# Altium PCB PCB_Flex_26.PcbDoc
Units mil, origin at the board's own origin, x right, y up, seen from the top; angles counter-clockwise.
Board outline 2362.2 x 531.5 mil, 2 copper layers (Top Layer, Bottom Layer), stack 3.556 mil thick; 4 components, 24 nets, 104 pads, 24 vias.
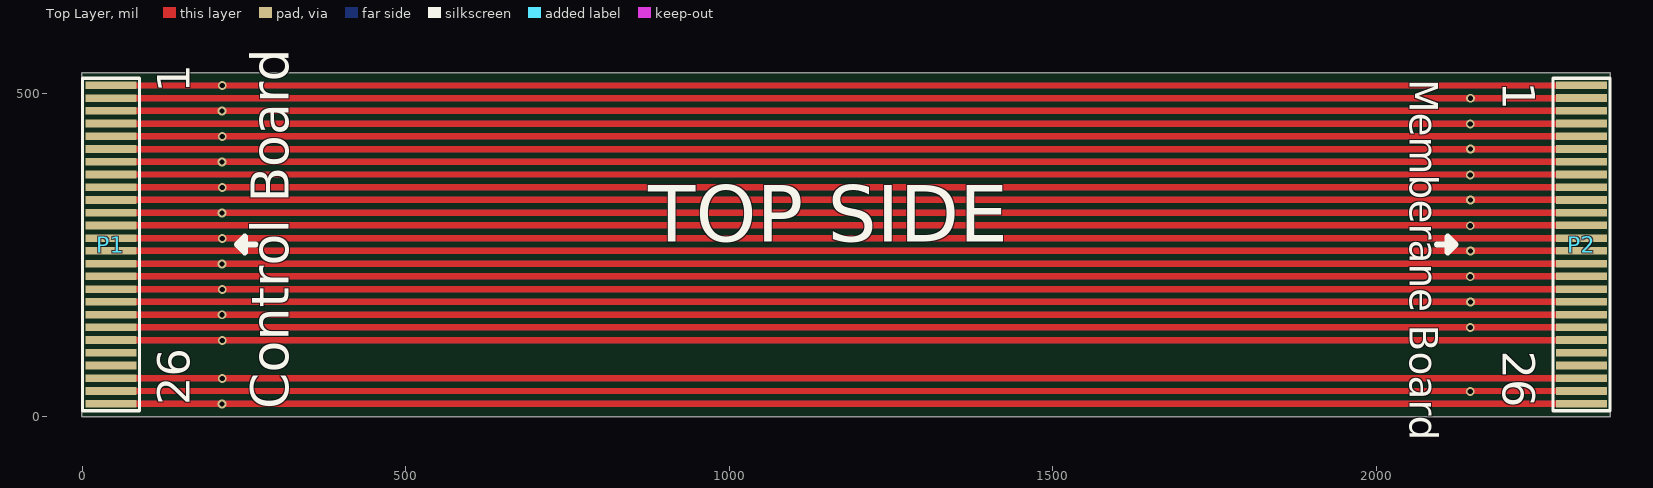
[diagram p0: Top Layer view]
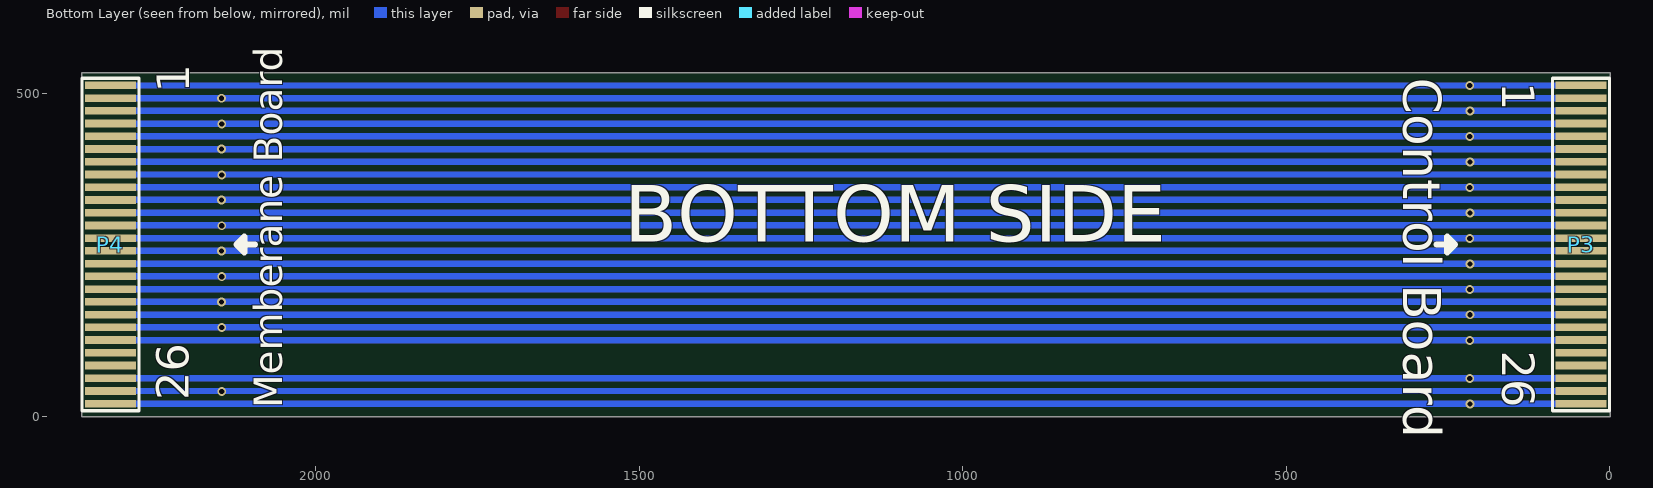
[diagram p1: Bottom Layer view, seen from below]

## Layer stack, top to bottom
Top Solder: solder mask 0.5, Solder Resist, Dk 3.5
Top Layer: signal copper 1.378
Dielectric 1: core 0.8, Polymide, Dk 4.8
Bottom Layer: signal copper 1.378
Bottom Solder: solder mask 0.5, Solder Resist, Dk 3.5

## Board outline
-1,0 2361.2,0 2361.2,531.5 -1,531.5

## Design rules (kind name [scope] priority, off if disabled: settings)
Clearance [All] p1: gap=5 ignorepadtopadclearanceinfootprint=FALSE
PolygonConnect [All] p1: connectstyle=Relief reliefconductorwidth=10 reliefentries=4 polygonreliefangle="90 Angle" airgapwidth=10
RoutingVias [All] p1: holewidth=11.81 width=23.62 viastyle="Through Hole" minholewidth=7.87 minwidth=13.78 maxholewidth=31.5 maxwidth=62.99
SolderMaskExpansion [All] p1: expansion=4 istentingtop=FALSE
Width [All] p1: maxlimit=10 minlimit=6 preferedwidth=8
30 further rules are at their usual default settings.

## Components (designator, comment, footprint, x,y, rotation, side; value= is the part's Value field where it differs from the comment)
P1 "26 Pin SMD PAD(2MM)" "26 PIN SMD PAD(2MM)" 44,265.91 r90 top locked
P2 "26 Pin SMD PAD(2MM)" "26 PIN SMD PAD(2MM)" 2317,265.92 r90 top locked
P3 "26 Pin SMD PAD(2MM)" "26 Pin SMD PAD(2mm)" 44,265.91 r90 bottom
P4 "26 Pin SMD PAD(2MM)" "26 Pin SMD PAD(2mm)" 2316.99,265.91 r90 bottom

## Footprints (in the part's own frame and the unit in brackets; to place one, negate y for a bottom-side part, rotate by r counter-clockwise, add the part's x,y. Pads: shape width x height; smd on the part's side, far side on the other; paste and mask are expansions set on the pad)
"26 PIN SMD PAD(2MM)" [mm]
  rect 0.3x2 smd: 1(6.25,0) 2(5.75,0) 3(5.25,0) 4(4.75,0) 5(4.25,0) 6(3.75,0) 7(3.25,0) 8(2.75,0) 9(2.25,0) 10(1.75,0) 11(1.25,0) 12(0.75,0) 13(0.25,0) 14(-0.25,0) 15(-0.75,0) 16(-1.25,0) 17(-1.75,0) 18(-2.25,0) 19(-2.75,0) 20(-3.25,0) 21(-3.75,0) 22(-4.25,0) 23(-4.75,0) 24(-5.25,0) 25(-5.75,0) 26(-6.25,0)
  silkscreen extent -6.53,-1.12 6.53,1.12
"26 Pin SMD PAD(2mm)" [mm]
  rect 0.3x2 smd: 1(6.25,0) 2(5.75,0) 3(5.25,0) 4(4.75,0) 5(4.25,0) 6(3.75,0) 7(3.25,0) 8(2.75,0) 9(2.25,0) 10(1.75,0) 11(1.25,0) 12(0.75,0) 13(0.25,0) 14(-0.25,0) 15(-0.75,0) 16(-1.25,0) 17(-1.75,0) 18(-2.25,0) 19(-2.75,0) 20(-3.25,0) 21(-3.75,0) 22(-4.25,0) 23(-4.75,0) 24(-5.25,0) 25(-5.75,0) 26(-6.25,0)
  silkscreen extent -6.53,-1.12 6.53,1.12

## Part data
P1 P2 P3 P4: "Ribbon Wire Connecting PADs, Length 1.6mm."

## Via types
v1: diameter 13.78, hole 7.87, Top Layer to Bottom Layer, tented both sides, 24 vias

## Nets (pads, with @x,y where several pads share a name; then routed paths per layer and width w, separated by ;. In a path a pad name is that pad's centre, name@x,y a point inside that pad or via, vN(x,y) a via of type N, cw(c..) or ccw(c..) an arc to the next point about the centre after c; other vN are vias at no path point)
COl_1: P1.1 P2.1 P3.1 P4.1 | length 4546.9
  Top Layer w10: P1.1 44.28,511.71 215.74,511.71 v1(216,511.45) 216.27,511.72 2316.73,511.72 P2.1
  Bottom Layer w10: P3.1 44.28,511.71 215.74,511.71 v1(216,511.45) 216.26,511.71 2316.73,511.71 P4.1
COl_2: P1.2 P2.2 P3.2 P4.2 | length 4546
  Top Layer w10: P1.2 P2.2@2316.99,492.29
  Bottom Layer w10: P3.2 P4.2
  other v1: 2145.28,492.04
COl_3: P1.3 P2.3 P3.3 P4.3 | length 4546
  Top Layer w10: P1.3@44.01,472.61 P2.3
  Bottom Layer w10: P3.3 P4.3@2316.98,472.6
  other v1: 215.73,472.35
COl_4: P1.4 P2.4 P3.4 P4.4 | length 4546
  Top Layer w10: P1.4 P2.4
  Bottom Layer w10: P3.4 P4.4
  other v1: 2145,452.41
COl_5: P1.5 P2.5 P3.5 P4.5 | length 4546
  Top Layer w10: P1.5 P2.5
  Bottom Layer w10: P3.5 P4.5
  other v1: 216.01,432.72
COl_6: P1.6 P2.6 P3.6 P4.6 | length 4546
  Top Layer w10: P1.6 P2.6
  Bottom Layer w10: P3.6 P4.6
  other v1: 2145.27,413.31
COl_7: P1.7 P2.7 P3.7 P4.7 | length 4546
  Top Layer w10: P1.7 P2.7
  Bottom Layer w10: P3.7 P4.7
  other v1: 215.74,393.61
COl_8: P1.8 P2.8 P3.8 P4.8 | length 4546
  Top Layer w10: P1.8 P2.8
  Bottom Layer w10: P3.8 P4.8
  other v1: 2144.98,373.65
COl_9: P1.9 P2.9 P3.9 P4.9 | length 4546
  Top Layer w10: P1.9 P2.9@2316.98,354.49
  Bottom Layer w10: P3.9 P4.9
  other v1: 216,353.97
COl_10: P1.10 P2.10 P3.10 P4.10 | length 4546
  Top Layer w10: P1.10 P2.10
  Bottom Layer w10: P3.10@43.99,334.8 P4.10@2316.98,334.8
  other v1: 2145.25,334.55
COl_11: P1.11 P2.11 P3.11 P4.11 | length 4546
  Top Layer w10: P1.11 P2.11
  Bottom Layer w10: P3.11 P4.11
  other v1: 215.73,314.87
COl_12: P1.12 P2.12 P3.12 P4.12 | length 4546
  Top Layer w10: P1.12 P2.12
  Bottom Layer w10: P3.12 P4.12
  other v1: 2145,294.93
COl_13: P1.13 P2.13 P3.13 P4.13 | length 4546
  Top Layer w10: P1.13 P2.13
  Bottom Layer w10: P3.13 P4.13
  other v1: 216,275.23
COl_14: P1.14 P2.14 P3.14 P4.14 | length 4546
  Top Layer w10: P1.14 P2.14
  Bottom Layer w10: P3.14 P4.14
  other v1: 2145.27,255.83
COl_15: P1.15 P2.15 P3.15 P4.15 | length 4546
  Top Layer w10: P1.15 P2.15
  Bottom Layer w10: P3.15 P4.15
  other v1: 215.73,236.13
COl_16: P1.16 P2.16 P3.16 P4.16 | length 4546
  Top Layer w10: P1.16 P2.16@2316.98,216.69
  Bottom Layer w10: P3.16 P4.16@2316.98,216.69
  other v1: 2145,216.19
GND: P1.26 P2.26 P3.26 P4.26 | length 4546
  Top Layer w10: P1.26 P2.26
  Bottom Layer w10: P3.26 P4.26
  other v1: 215.73,19.59
ROW_1: P1.17 P2.17 P3.17 P4.17 | length 4545.4
  Top Layer w10: P1.17 v1@216,197.01 ; v1@216.54,197.02 P2.17
  Bottom Layer w10: P3.17 P4.17
  other v1: 216,196.49
ROW_2: P1.18 P2.18 P3.18 P4.18 | length 4546
  Top Layer w10: P1.18 P2.18
  Bottom Layer w10: P3.18 P4.18
  other v1: 2145.27,177.09
ROW_3: P1.19 P2.19 P3.19 P4.19 | length 4546
  Top Layer w10: P1.19 P2.19
  Bottom Layer w10: P3.19 P4.19
  other v1: 215.73,157.39
ROW_4: P1.20 P2.20 P3.20 P4.20 | length 4546
  Top Layer w10: P1.20 P2.20
  Bottom Layer w10: P3.20 P4.20
  other v1: 2145,137.45
ROW_5: P1.21 P2.21 P3.21 P4.21 | length 4546
  Top Layer w10: P1.21 P2.21
  Bottom Layer w10: P3.21 P4.21
  other v1: 216,117.75
VCC_3V3: P1.25 P2.25 P3.25 P4.25 | length 4546
  Top Layer w10: P1.25 P2.25
  Bottom Layer w10: P3.25 P4.25
  other v1: 2145,39.02
VDD: P1.24 P2.24 P3.24 P4.24 | length 4546
  Top Layer w10: P1.24 P2.24
  Bottom Layer w10: P3.24 P4.24
  other v1: 216,58.69
pads on no net: P1.22 P1.23 P2.22 P2.23 P3.22 P3.23 P4.22 P4.23

## Silkscreen, mask and mechanical layers (free items; w line width, h text height)
Top Overlay:
  lines w10: 251,265.95 267,265.95 ; 2094.01,265.96 2110.01,265.96 ; 239,265.95 251,277.95 251,253.95 239,265.95 ; 2110.01,253.96 2110.01,277.96 2122.01,265.96 2110.01,253.96
  text "Memberane Board" at 2036.66,521.71 h75 r270
  text "1" at 2195,517.45 h50 r270
  text "1" at 166,500.45 h50 r90
  text "TOP SIDE" at 874.55,241.77 h150
  text "26" at 2195,101.45 h50 r270
  text "26" at 166,17.45 h50 r90
  text "Control Board" at 338.12,11.54 h100 r90
Bottom Overlay:
  lines w10: 251,265.95 267,265.95 ; 2094.01,265.96 2110.01,265.96 ; 239,265.95 251,253.95 251,277.95 239,265.95 ; 2110.01,253.96 2122.01,265.96 2110.01,277.96 2110.01,253.96
  text "Control Board" at 338.12,523.36 h100 r90
  text "1" at 166,516.45 h50 r90
  text "1" at 2195,500.45 h50 r270
  text "BOTTOM SIDE" at 1522.67,241.77 h150
  text "26" at 166,101.45 h50 r90
  text "26" at 2196,25.45 h50 r270
  text "Memberane Board" at 2036.66,13.19 h75 r270
Mechanical 2:
  lines w5: 0,0 2361.2,0 2361.2,531.5 0,531.5 0,0

## Dimensions
0,531.5 to 0,0 on Mechanical 1
0,531.5 to 2361.2,531.5 on Mechanical 1